# Altium PCB ZYNQ_BOARD.PcbDoc (part 2 of 9)
Units mm, origin at the board's own origin, x right, y up, seen from the top; angles counter-clockwise.
Board outline 120 x 66 mm, 10 copper layers (Top Layer, Internal Plane 1 (GND), Middle Layer 1, Middle Layer 2, Internal Plane 2 (+1.0V), Middle Layer 3, Middle Layer 4, Middle Layer 5 (PWR), Internal Plane 3 (GND), Bottom Layer), stack 0.982 mm thick; 333 components, 331 nets, 1511 pads, 1077 vias.
Unrouted connection lines stored in the file: 30.
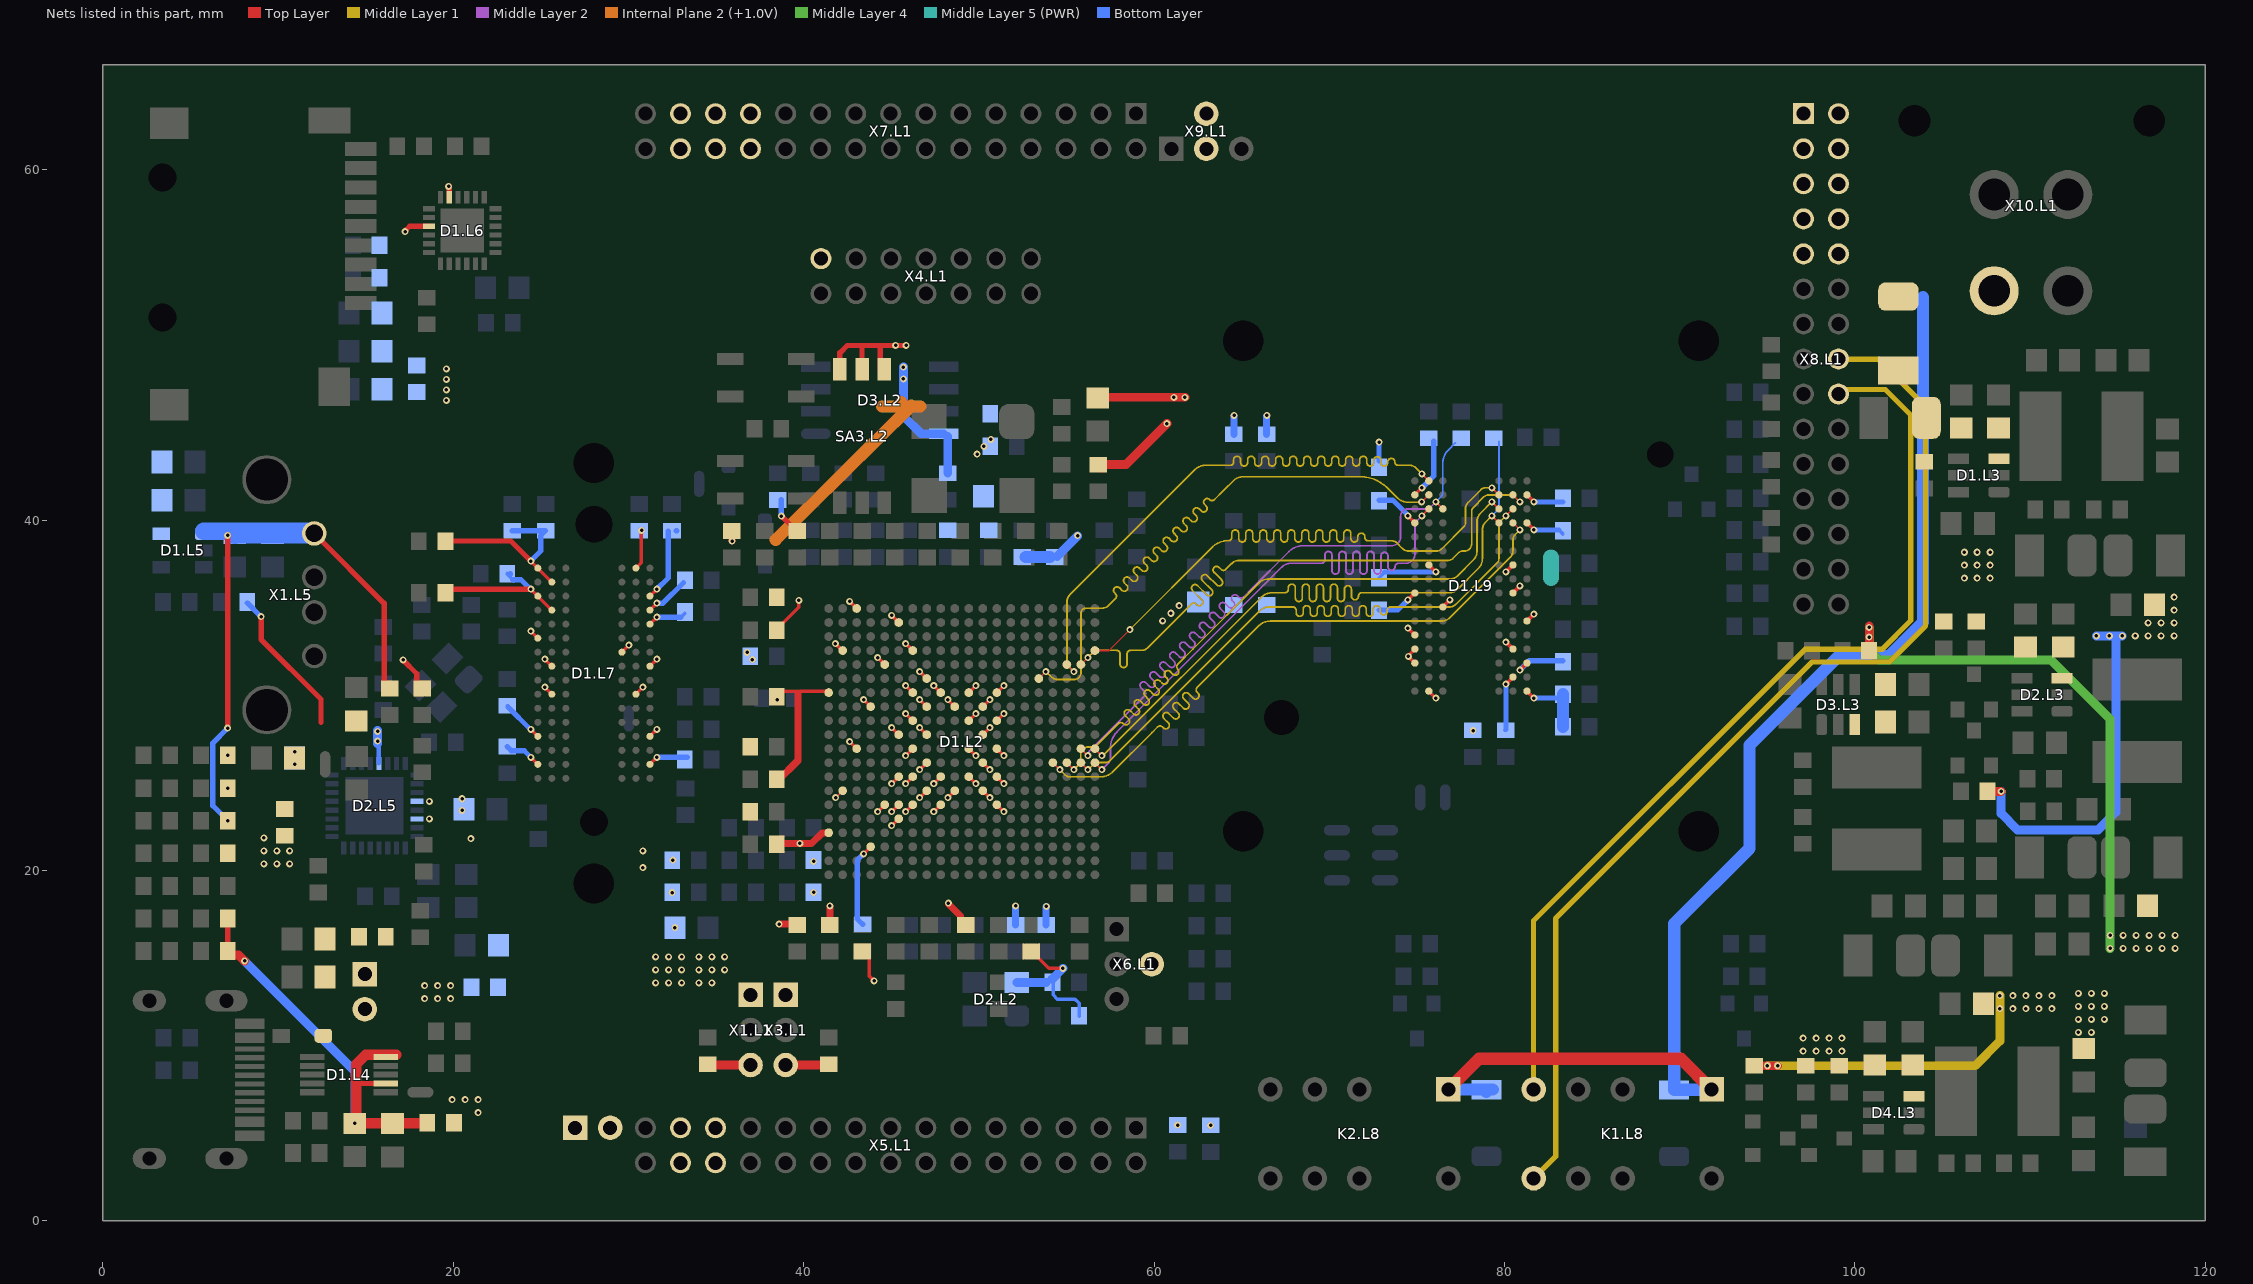
[diagram p10: the nets of this part, all layers, seen from the top]

## Footprints (in the part's own frame and the unit in brackets; to place one, negate y for a bottom-side part, rotate by r counter-clockwise, add the part's x,y. Pads: shape width x height; smd on the part's side, far side on the other; paste and mask are expansions set on the pad) (continued)
CLG-400 [mm]
  round 0.5 smd: A1(-7.6,7.6) A2(-6.8,7.6) A3(-6,7.6) A4(-5.2,7.6) A5(-4.4,7.6) A6(-3.6,7.6) A7(-2.8,7.6) A8(-2,7.6) A9(-1.2,7.6) A10(-0.4,7.6) A11(0.4,7.6) A12(1.2,7.6) A13(2,7.6) A14(2.8,7.6) A15(3.6,7.6) A16(4.4,7.6) A17(5.2,7.6) A18(6,7.6) A19(6.8,7.6) A20(7.6,7.6) B1(-7.6,6.8) B2(-6.8,6.8) B3(-6,6.8) B4(-5.2,6.8) B5(-4.4,6.8) B6(-3.6,6.8) B7(-2.8,6.8) B8(-2,6.8) B9(-1.2,6.8) B10(-0.4,6.8) B11(0.4,6.8) B12(1.2,6.8) B13(2,6.8) B14(2.8,6.8) B15(3.6,6.8) B16(4.4,6.8) B17(5.2,6.8) B18(6,6.8) B19(6.8,6.8) B20(7.6,6.8) C1(-7.6,6) C2(-6.8,6) C3(-6,6) C4(-5.2,6) C5(-4.4,6) C6(-3.6,6) C7(-2.8,6) C8(-2,6) C9(-1.2,6) C10(-0.4,6) C11(0.4,6) C12(1.2,6) C13(2,6) C14(2.8,6) C15(3.6,6) C16(4.4,6) C17(5.2,6) C18(6,6) C19(6.8,6) C20(7.6,6) D1(-7.6,5.2) D2(-6.8,5.2) D3(-6,5.2) D4(-5.2,5.2) D5(-4.4,5.2) D6(-3.6,5.2) D7(-2.8,5.2) D8(-2,5.2) D9(-1.2,5.2) D10(-0.4,5.2) D11(0.4,5.2) D12(1.2,5.2) D13(2,5.2) D14(2.8,5.2) D15(3.6,5.2) D16(4.4,5.2) D17(5.2,5.2) D18(6,5.2) D19(6.8,5.2) D20(7.6,5.2) E1(-7.6,4.4) E2(-6.8,4.4) E3(-6,4.4) E4(-5.2,4.4) E5(-4.4,4.4) E6(-3.6,4.4) E7(-2.8,4.4) E8(-2,4.4) E9(-1.2,4.4) E10(-0.4,4.4) E11(0.4,4.4) E12(1.2,4.4) E13(2,4.4) E14(2.8,4.4) E15(3.6,4.4) E16(4.4,4.4) E17(5.2,4.4) E18(6,4.4) E19(6.8,4.4) E20(7.6,4.4) F1(-7.6,3.6) F2(-6.8,3.6) F3(-6,3.6) F4(-5.2,3.6) F5(-4.4,3.6) F6(-3.6,3.6) F7(-2.8,3.6) F8(-2,3.6) F9(-1.2,3.6) F10(-0.4,3.6) F11(0.4,3.6) F12(1.2,3.6) F13(2,3.6) F14(2.8,3.6) F15(3.6,3.6) F16(4.4,3.6) F17(5.2,3.6) F18(6,3.6) F19(6.8,3.6) F20(7.6,3.6) G1(-7.6,2.8) G2(-6.8,2.8) G3(-6,2.8) G4(-5.2,2.8) G5(-4.4,2.8) G6(-3.6,2.8) G7(-2.8,2.8) G8(-2,2.8) G9(-1.2,2.8) G10(-0.4,2.8) G11(0.4,2.8) G12(1.2,2.8) G13(2,2.8) G14(2.8,2.8) G15(3.6,2.8) G16(4.4,2.8) G17(5.2,2.8) G18(6,2.8) G19(6.8,2.8) G20(7.6,2.8) H1(-7.6,2) H2(-6.8,2) H3(-6,2) H4(-5.2,2) H5(-4.4,2) H6(-3.6,2) H7(-2.8,2) H8(-2,2) H9(-1.2,2) H10(-0.4,2) H11(0.4,2) H12(1.2,2) H13(2,2) H14(2.8,2) H15(3.6,2) H16(4.4,2) H17(5.2,2) H18(6,2) H19(6.8,2) H20(7.6,2) J1(-7.6,1.2) J2(-6.8,1.2) J3(-6,1.2) J4(-5.2,1.2) J5(-4.4,1.2) J6(-3.6,1.2) J7(-2.8,1.2) J8(-2,1.2) J9(-1.2,1.2) J10(-0.4,1.2) J11(0.4,1.2) J12(1.2,1.2) J13(2,1.2) J14(2.8,1.2) J15(3.6,1.2) J16(4.4,1.2) J17(5.2,1.2) J18(6,1.2) J19(6.8,1.2) J20(7.6,1.2) K1(-7.6,0.4) K2(-6.8,0.4) K3(-6,0.4) K4(-5.2,0.4) K5(-4.4,0.4) K6(-3.6,0.4) K7(-2.8,0.4) K8(-2,0.4) K9(-1.2,0.4) K10(-0.4,0.4) K11(0.4,0.4) K12(1.2,0.4) K13(2,0.4) K14(2.8,0.4) K15(3.6,0.4) K16(4.4,0.4) K17(5.2,0.4) K18(6,0.4) K19(6.8,0.4) K20(7.6,0.4) L1(-7.6,-0.4) L2(-6.8,-0.4) L3(-6,-0.4) L4(-5.2,-0.4) L5(-4.4,-0.4) L6(-3.6,-0.4) L7(-2.8,-0.4) L8(-2,-0.4) L9(-1.2,-0.4) L10(-0.4,-0.4) L11(0.4,-0.4) L12(1.2,-0.4) L13(2,-0.4) L14(2.8,-0.4) L15(3.6,-0.4) L16(4.4,-0.4) L17(5.2,-0.4) L18(6,-0.4) L19(6.8,-0.4) L20(7.6,-0.4) M1(-7.6,-1.2) M2(-6.8,-1.2) M3(-6,-1.2) M4(-5.2,-1.2) M5(-4.4,-1.2) M6(-3.6,-1.2) M7(-2.8,-1.2) M8(-2,-1.2) M9(-1.2,-1.2) M10(-0.4,-1.2) M11(0.4,-1.2) M12(1.2,-1.2) M13(2,-1.2) M14(2.8,-1.2) M15(3.6,-1.2) M16(4.4,-1.2) M17(5.2,-1.2) M18(6,-1.2) M19(6.8,-1.2) M20(7.6,-1.2) N1(-7.6,-2) N2(-6.8,-2) N3(-6,-2) N4(-5.2,-2) N5(-4.4,-2) N6(-3.6,-2) N7(-2.8,-2) N8(-2,-2) N9(-1.2,-2) N10(-0.4,-2) N11(0.4,-2) N12(1.2,-2) N13(2,-2) N14(2.8,-2) N15(3.6,-2) N16(4.4,-2) N17(5.2,-2) N18(6,-2) N19(6.8,-2) N20(7.6,-2) P1(-7.6,-2.8) P2(-6.8,-2.8) P3(-6,-2.8) P4(-5.2,-2.8) P5(-4.4,-2.8) P6(-3.6,-2.8) P7(-2.8,-2.8) P8(-2,-2.8) P9(-1.2,-2.8) P10(-0.4,-2.8) P11(0.4,-2.8) P12(1.2,-2.8) P13(2,-2.8) P14(2.8,-2.8) P15(3.6,-2.8) P16(4.4,-2.8) P17(5.2,-2.8) P18(6,-2.8) P19(6.8,-2.8) P20(7.6,-2.8) R1(-7.6,-3.6) R2(-6.8,-3.6) R3(-6,-3.6) R4(-5.2,-3.6) R5(-4.4,-3.6) R6(-3.6,-3.6) R7(-2.8,-3.6) R8(-2,-3.6) R9(-1.2,-3.6) R10(-0.4,-3.6) R11(0.4,-3.6) R12(1.2,-3.6) R13(2,-3.6) R14(2.8,-3.6) R15(3.6,-3.6) R16(4.4,-3.6) R17(5.2,-3.6) R18(6,-3.6) R19(6.8,-3.6) R20(7.6,-3.6) T1(-7.6,-4.4) T2(-6.8,-4.4) T3(-6,-4.4) T4(-5.2,-4.4) T5(-4.4,-4.4) T6(-3.6,-4.4) T7(-2.8,-4.4) T8(-2,-4.4) T9(-1.2,-4.4) T10(-0.4,-4.4) T11(0.4,-4.4) T12(1.2,-4.4) T13(2,-4.4) T14(2.8,-4.4) T15(3.6,-4.4) T16(4.4,-4.4) T17(5.2,-4.4) T18(6,-4.4) T19(6.8,-4.4) T20(7.6,-4.4) U1(-7.6,-5.2) U2(-6.8,-5.2) U3(-6,-5.2) U4(-5.2,-5.2) U5(-4.4,-5.2) U6(-3.6,-5.2) U7(-2.8,-5.2) U8(-2,-5.2) U9(-1.2,-5.2) U10(-0.4,-5.2) U11(0.4,-5.2) U12(1.2,-5.2) U13(2,-5.2) U14(2.8,-5.2) U15(3.6,-5.2) U16(4.4,-5.2) U17(5.2,-5.2) U18(6,-5.2) U19(6.8,-5.2) U20(7.6,-5.2) V1(-7.6,-6) V2(-6.8,-6) V3(-6,-6) V4(-5.2,-6) V5(-4.4,-6) V6(-3.6,-6) V7(-2.8,-6) V8(-2,-6) V9(-1.2,-6) V10(-0.4,-6) V11(0.4,-6) V12(1.2,-6) V13(2,-6) V14(2.8,-6) V15(3.6,-6) V16(4.4,-6) V17(5.2,-6) V18(6,-6) V19(6.8,-6) V20(7.6,-6) W1(-7.6,-6.8) W2(-6.8,-6.8) W3(-6,-6.8) W4(-5.2,-6.8) W5(-4.4,-6.8) W6(-3.6,-6.8) W7(-2.8,-6.8) W8(-2,-6.8) W9(-1.2,-6.8) W10(-0.4,-6.8) W11(0.4,-6.8) W12(1.2,-6.8) W13(2,-6.8) W14(2.8,-6.8) W15(3.6,-6.8) W16(4.4,-6.8) W17(5.2,-6.8) W18(6,-6.8) W19(6.8,-6.8) W20(7.6,-6.8) Y1(-7.6,-7.6) Y2(-6.8,-7.6) Y3(-6,-7.6) Y4(-5.2,-7.6) Y5(-4.4,-7.6) Y6(-3.6,-7.6) Y7(-2.8,-7.6) Y8(-2,-7.6) Y9(-1.2,-7.6) Y10(-0.4,-7.6) Y11(0.4,-7.6) Y12(1.2,-7.6) Y13(2,-7.6) Y14(2.8,-7.6) Y15(3.6,-7.6) Y16(4.4,-7.6) Y17(5.2,-7.6) Y18(6,-7.6) Y19(6.8,-7.6) Y20(7.6,-7.6)
  silkscreen extent -8.5,-8.5 8.5,8.5
"DS1073-01-2x2-MR1T6 (4 pin)" [mm]
  round 1.5 hole 1.8: 0(-6.7,4.85) 0(6.7,4.85)
  round 2.8 hole 1.8: 1(-2.15,-4.85) 2(-2.15,0.65) 3(2.05,-4.85) 4(2.05,0.65)
  silkscreen extent -9.9,1.95 9.8,7.45
"DSX321G (3.2x2.5x0.7)" [mm] "DSX321G"
  rrect50% 1.4x1.2 smd: 1(-1.1,-0.85)
  rect 1.4x1.2 smd: 2(1.1,-0.85) 3(1.1,0.85) 4(-1.1,0.85)
  silkscreen extent -2.25,-1.24 1.6,1.24
KLS7-TS3401 [mm]
  rect 0.7x1.5 smd: 1(1.075,2.025) 2(-1.075,2.025) 3(-1.075,-2.025) 4(1.075,-2.025)
  silkscreen extent -1.79,-2.1 1.78,2.1
"MICRO-SD (9 pin)" [mm]
  round 0.7 hole 1.6: 0(-4.86,-5.67) 0(3.14,-5.67)
  rect 0.8x1.8 smd: 1(2.32,5.67) 2(1.22,5.67) 3(0.12,5.67) 4(-0.98,5.67) 5(-2.08,5.67) 6(-3.18,5.67) 7(-4.28,5.67) 8(-5.38,5.67) 9(-6.48,5.67)
  rect 1.8x2.2 smd: 10(-7.96,-5.26) 13(8.11,-5.26)
  rect 1.5x2.4 smd: 11(-8.11,3.87)
  rect 2.2x1.8 smd: 12(7.1,4.15)
  silkscreen extent -7.29,-9.66 7.43,4.84
"MICRO-USB (USB3,1TYPE-C 16PF-26)" [mm]
  rect 1.7x0.6 smd: 1(2.865,-3.2) 2(2.865,-2.4) 11(2.865,2.4) 12(2.865,3.2)
  rect 1.7x0.3 smd: 3(2.865,-1.75) 4(2.865,-1.25) 5(2.865,-0.75) 6(2.865,-0.25) 7(2.865,0.25) 8(2.865,0.75) 9(2.865,1.25) 10(2.865,1.75)
  oval 1.9x1.2 hole 0.8 slot 1.5 at 0 deg: 13(-2.865,-4.5) 13(-2.865,4.5)
  oval 2.4x1.2 hole 0.8 slot 2 at 0 deg: 13(1.535,-4.5) 13(1.535,4.5)
  silkscreen extent -5.47,-4.5 1.53,4.5
MSOP-10 [mm]
  rect 1.4x0.35 smd: 1(-2.1,1) 2(-2.1,0.5) 3(-2.1,0) 4(-2.1,-0.5) 5(-2.1,-1) 6(2.1,-1) 7(2.1,-0.5) 8(2.1,0) 9(2.1,0.5) 10(2.1,1)
  silkscreen extent -1.1,-1.55 1.1,1.55
"PBD2-30 (DS1026-06-2x15)"#1 [mm]
  rect 1.2x1.2 hole 0.8: 1(-14,-1)
  round 1.2 hole 0.8: 2(-14,1) 3(-12,-1) 4(-12,1) 5(-10,-1) 6(-10,1) 7(-8,-1) 8(-8,1) 9(-6,-1) 10(-6,1) 11(-4,-1) 12(-4,1) 13(-2,-1) 14(-2,1) 15(0,-1) 16(0,1) 17(2,-1) 18(2,1) 19(4,-1) 20(4,1) 21(6,-1) 22(6,1) 23(8,-1) 24(8,1) 25(10,-1) 26(10,1) 27(12,-1) 28(12,1) 29(14,-1) 30(14,1)
  silkscreen extent -15,-2 15,2
"PBD2-30 (DS1026-06-2x15)"#2 [mm]
  rect 1.2x1.2 hole 0.8: 1(-14,-1)
  round 1.2 hole 0.8: 2(-14,1) 3(-12,-1) 4(-12,1) 5(-10,-1) 6(-10,1) 7(-8,-1) 8(-8,1) 9(-6,-1) 10(-6,1) 11(-4,-1) 12(-4,1) 13(-2,-1) 15(0,-1) 17(2,-1) 18(2,1) 19(4,-1) 20(4,1) 21(6,-1) 22(6,1) 23(8,-1) 24(8,1) 25(10,-1) 26(10,1) 27(12,-1) 28(12,1) 29(14,-1) 30(14,1)
  oval 1.1x1.2 hole 0.8: 14(-2,1) 16(0,1)
  silkscreen extent -15,-2 15,2
PLD2-2 [mm]
  rect 1.4x1.4 hole 0.8: 1(0,-1)
  round 1.4 hole 0.8: 2(0,1)
  silkscreen extent -1,-2 1,2
PLD6-2 [mm]
  rect 1.4x1.4 hole 0.8: 1(-2,-1)
  round 0 all layers, no hole: 2(-2,1) 6(2,1)
  round 1.4 hole 0.8: 3(0,-1) 4(0,1) 5(2,-1)
  silkscreen extent -3,-2 3,2
Plosh15X06 [mm]
  oval 0.6x1.5 smd: 1(0,0)
  silkscreen extent -0.61,-1.07 0.61,1.07
PLS3-2 [mm]
  rect 1.4x1.4 hole 0.8: 1(0,-1)
  round 1.4 hole 0.8: 2(0,1) 3(0,3)
  silkscreen extent -1,-2 1,4
QFN-24 [mm]
  rect 0.7x0.3 smd: 1(-1.9,1.25) 2(-1.9,0.75) 3(-1.9,0.25) 4(-1.9,-0.25) 5(-1.9,-0.75) 6(-1.9,-1.25) 13(1.9,-1.25) 14(1.9,-0.75) 15(1.9,-0.25) 16(1.9,0.25) 17(1.9,0.75) 18(1.9,1.25)
  rect 0.3x0.7 smd: 7(-1.25,-1.9) 8(-0.75,-1.9) 9(-0.25,-1.9) 10(0.25,-1.9) 11(0.75,-1.9) 12(1.25,-1.9) 19(1.25,1.9) 20(0.75,1.9) 21(0.25,1.9) 22(-0.25,1.9) 23(-0.75,1.9) 24(-1.25,1.9)
  rect 2.5x2.5 smd: Pad(0,0)
  silkscreen extent -2.6,-2.6 2.6,2.6
QFN-32 [mm]
  rect 0.75x0.3 smd: 1(-2.42,1.75) 2(-2.42,1.25) 3(-2.42,0.75) 4(-2.42,0.25) 5(-2.42,-0.25) 6(-2.42,-0.75) 7(-2.42,-1.25) 8(-2.42,-1.75) 17(2.42,-1.75) 18(2.42,-1.25) 19(2.42,-0.75) 20(2.42,-0.25) 21(2.42,0.25) 22(2.42,0.75) 23(2.42,1.25) 24(2.42,1.75)
  rect 0.3x0.75 smd: 9(-1.75,-2.42) 10(-1.25,-2.42) 11(-0.75,-2.42) 12(-0.25,-2.42) 13(0.25,-2.42) 14(0.75,-2.42) 15(1.25,-2.42) 16(1.75,-2.42) 25(1.75,2.42) 26(1.25,2.42) 27(0.75,2.42) 28(0.25,2.42) 29(-0.25,2.42) 30(-0.75,2.42) 31(-1.25,2.42) 32(-1.75,2.42)
  rect 3.3x3.3 smd: Pad(0,0)
  silkscreen extent -2.55,-2.55 2.55,2.55
SMB(DO-214AA) [mm]
  rrect50% 1.62x2.3 smd: 1(-2.11,0)
  rect 1.62x2.3 smd: 2(2.11,0)
  silkscreen extent -2.35,-1.95 2.35,1.95
SMD03225 [mm]
  rrect50% 1.4x1.2 smd: 1(-1.2,-0.95)
  rect 1.4x1.2 smd: 2(1.2,-0.95) 3(1.2,0.95) 4(-1.2,0.95)
  silkscreen extent -1.6,-1.25 1.6,1.25, body extent -1.6,-1.25 1.6,1.25, height 1.04
SOD80C [mm]
  rrect50% 1.1x1.7 smd: 1(-1.9,0)
  rect 1.1x1.7 smd: 2(1.9,0)
  silkscreen extent -1.85,-1.17 1.85,1.17
SOD323 [mm]
  rect 1x0.8 smd: 1(1.2,0)
  rrect50% 1x0.8 smd: 2(-1.2,0)
  silkscreen extent -0.9,-0.84 0.9,0.84
SOT23-6 [mm]
  rrect50% 0.6x1.2 smd: 1(-0.95,-1.1)
  rect 0.6x1.2 smd: 2(0,-1.1) 3(0.95,-1.1) 4(0.95,1.2) 5(0,1.2) 6(-0.95,1.2)
  silkscreen extent -1.57,-2.03 1.58,2.13
SOT-23 [mm]
  rect 0.8x0.9 smd: 1(-0.95,-1) 2(0.95,-1) 3(0,1)
  silkscreen extent -1.55,-0.72 1.55,0.7
SOT-23-5 [mm]
  rrect50% 0.7x1 smd: 1(0.95,1.2)
  rect 0.7x1 smd: 2(0,1.2) 3(-0.95,1.2) 4(-0.95,-1.2) 5(0.95,-1.2)
  silkscreen extent -1.62,-0.88 1.62,0.88
"SWITCH (DIP-03, DT-03, step 1.27)" [mm]
  rect 0.76x1.3 smd: 1(-1.27,-3.81) 2(0,-3.81) 3(1.27,-3.81) 4(1.27,3.81) 5(0,3.81) 6(-1.27,3.81)
  silkscreen extent -2.25,-3 2.25,3
TAJB [mm]
  rrect50% 1.65x2.4 smd: 1(-1.5,0)
  rect 1.65x2.4 smd: 2(1.5,0)
  silkscreen extent -1.7,-1.53 1.7,1.53
"USBA-1J (DS1095 B-R)" [mm]
  round 1.4 hole 1: 1(-3.5,1.355) 2(-1,1.355) 3(1,1.355) 4(3.5,1.355)
  round 2.8 hole 2.4: 5(-6.57,-1.355) 6(6.57,-1.355)
  silkscreen extent -7.25,-11.63 7.25,2.37
V23079A1001B301 [mm]
  rect 1.4x1.4 hole 0.8: 1(-6.3,-2.54)
  round 1.4 hole 0.8: 3(-1.22,-2.54) 4(1.32,-2.54) 5(3.86,-2.54) 8(3.86,2.54) 9(1.32,2.54) 10(-1.22,2.54) 12(-6.3,2.54)
  silkscreen extent -7.4,-3.63 7.25,3.63
"VFBGA-96 (ZIF)" [mm]
  round 2.2 hole 2.3: 0(0,-12) 0(0,12)
  round 0.2 hole 1.6: 0(0,-8.5)
  round 2 hole 2.1: 0(0,8.5)
  round 0.4 smd: A1(-3.2,6) A2(-2.4,6) A3(-1.6,6) A7(1.6,6) A8(2.4,6) A9(3.2,6) B1(-3.2,5.2) B2(-2.4,5.2) B3(-1.6,5.2) B7(1.6,5.2) B8(2.4,5.2) B9(3.2,5.2) C1(-3.2,4.4) C2(-2.4,4.4) C3(-1.6,4.4) C7(1.6,4.4) C8(2.4,4.4) C9(3.2,4.4) D1(-3.2,3.6) D2(-2.4,3.6) D3(-1.6,3.6) D7(1.6,3.6) D8(2.4,3.6) D9(3.2,3.6) E1(-3.2,2.8) E2(-2.4,2.8) E3(-1.6,2.8) E7(1.6,2.8) E8(2.4,2.8) E9(3.2,2.8) F1(-3.2,2) F2(-2.4,2) F3(-1.6,2) F7(1.6,2) F8(2.4,2) F9(3.2,2) G1(-3.2,1.2) G2(-2.4,1.2) G3(-1.6,1.2) G7(1.6,1.2) G8(2.4,1.2) G9(3.2,1.2) H1(-3.2,0.4) H2(-2.4,0.4) H3(-1.6,0.4) H7(1.6,0.4) H8(2.4,0.4) H9(3.2,0.4) J1(-3.2,-0.4) J2(-2.4,-0.4) J3(-1.6,-0.4) J7(1.6,-0.4) J8(2.4,-0.4) J9(3.2,-0.4) K1(-3.2,-1.2) K2(-2.4,-1.2) K3(-1.6,-1.2) K7(1.6,-1.2) K8(2.4,-1.2) K9(3.2,-1.2) L1(-3.2,-2) L2(-2.4,-2) L3(-1.6,-2) L7(1.6,-2) L8(2.4,-2) L9(3.2,-2) M1(-3.2,-2.8) M2(-2.4,-2.8) M3(-1.6,-2.8) M7(1.6,-2.8) M8(2.4,-2.8) M9(3.2,-2.8) N1(-3.2,-3.6) N2(-2.4,-3.6) N3(-1.6,-3.6) N7(1.6,-3.6) N8(2.4,-3.6) N9(3.2,-3.6) P1(-3.2,-4.4) P2(-2.4,-4.4) P3(-1.6,-4.4) P7(1.6,-4.4) P8(2.4,-4.4) P9(3.2,-4.4) R1(-3.2,-5.2) R2(-2.4,-5.2) R3(-1.6,-5.2) R7(1.6,-5.2) R8(2.4,-5.2) R9(3.2,-5.2) T1(-3.2,-6) T2(-2.4,-6) T3(-1.6,-6) T7(1.6,-6) T8(2.4,-6) T9(3.2,-6)
  silkscreen extent -6.5,-19.65 6.5,18.35
VLS6045EX-4R7M-H [mm]
  rect 2.4x5.1 smd: 1(-2.35,0) 2(2.35,0)
  silkscreen extent -3.15,-3 3.15,3
VSOP-8 [mm]
  oval 1.7x0.6 smd: 1(-3.65,1.905)
  rect 1.7x0.6 smd: 2(-3.65,0.635) 3(-3.65,-0.635) 4(-3.65,-1.905) 5(3.65,-1.905) 6(3.65,-0.635) 7(3.65,0.635) 8(3.65,1.905)
  silkscreen extent -2.41,-2.7 2.39,2.68
"XO91050UITA (7x5mm)" [mm] "HC-49SM"
  rrect50% 2x2 smd: 1(-2.497,-2.105)
  rect 2x2 smd: 2(2.503,-2.105) 3(2.497,2.105) 4(-2.503,2.105)
  silkscreen extent -3.5,-2.5 3.5,2.5

## Part data
C1.L2 C1.L7 C1.L9 C2.L2 C2.L7 C2.L9 C3.L2 C3.L7 C3.L9 C4.L2 C4.L7 C4.L9 C5.L2 C5.L7 C5.L9 C6.L2 C6.L7 C6.L9 C7.L2 C7.L7 C7.L9 C8.L2 C8.L7 C8.L9 C9.L2 C9.L7 C9.L9 C10.L2 C10.L7 C10.L9 C11.L2 C11.L7 C11.L9 C12.L2 C12.L7 C12.L9 C13.L2 C13.L5 C14.L2 C14.L5 C14.L7 C14.L9 C15.L2 C15.L7 C15.L9 C16.L2 C16.L7 C16.L9 C17.L2 C17.L7 C17.L9 C18.L2 C19.L2 C20.L2 C21.L2 C22.L2 C23.L2 C24.L2 C25.L2 C26.L2 C27.L2 C28.L2 C29.L2 C30.L2 C31.L2 C32.L2 C33.L2 C34.L2 C35.L2 C36.L2 C37.L2 C38.L2 C39.L2 C40.L2 C41.L2 C42.L2 C43.L2 C44.L2 C45.L2 C46.L2 C47.L2 C48.L2 C49.L2 C50.L2: library part "Cap (0603) AVX", ComponentHeigt=1.3, Firme=AVX, KIND=Конденсатор, Leadform=SMD, Packaging=0805
C1.L3 C1.L4 C1.L5 C1.L6 C2.L3 C2.L4 C2.L5 C2.L6 C3.L3 C3.L4 C3.L5 C3.L6 C4.L3 C4.L4 C4.L5 C4.L6 C5.L3 C5.L5 C6.L3 C6.L5 C7.L5 C8.L3 C8.L5 C9.L3 C9.L5 C10.L3 C10.L5 C11.L3 C11.L5 C12.L3 C12.L5 C13.L3 C13.L7 C13.L9 C14.L3 C15.L3 C16.L3 C17.L3 C18.L3 C19.L3 C20.L3 C21.L3 C22.L3 C23.L3 C24.L3 C25.L3 C28.L3: library part "Cap (0805) AVX", ComponentHeigt=1.3, Firme=AVX, KIND=Конденсатор, Leadform=SMD, Packaging=0805
C7.L3 C26.L3 C27.L3 C29.L3 C30.L3 C31.L3 C32.L3 C33.L3 C34.L3: library part "TAJ B-AVX", ComponentHeigt=1.6, ComponentWeigt=??, Firme=AVX, KIND=Конденсатор, Packaging=R
D1.L9: library part "FBGA-96 (DDR3)", ComponentHeigt=1.8, Firme=Linear, KIND=Микросхема, Leadform=формована, Packaging=SOT-223
D3.L2: library part "W25Q64VSS (VSOP-8)", ComponentHeigt=1.8, Firme=Linear, KIND=Микросхема, Leadform=формована, Packaging=SOT-223
D4.L2: library part "XO91050UITA (50MHz,7x5mm)", ComponentHeigt=1.8, Firme=Linear, KIND=Микросхема, Leadform=формована, Packaging=SOT-223
KP1.L2 KP1.L5 KP1.L7 KP2.L2 KP3.L2 KP4.L2 KP5.L2 KP6.L2 KP7.L2 KP8.L2 KP9.L2 TNOW: library part Contplosh1.5x0.6
L1.L3 L2.L3 L3.L3 L4.L3: library part "VLS6045EX-4R7M-H (6x6x4.5)", ComponentHeigt=3.2, Firm=TDK, KIND="Катушка индуктивности B82432T TDK", Name="Катушка индуктивности", Packaging="SIMIT 1812-T", Typ=B82432T
R1.L1 R1.L2 R1.L3 R1.L4 R1.L5 R1.L6 R1.L7 R1.L8 R1.L9 R2.L1 R2.L2 R2.L3 R2.L4 R2.L5 R2.L6 R2.L7 R2.L8 R2.L9 R3.L2 R3.L3 R3.L4 R3.L5 R3.L6 R3.L7 R3.L8 R3.L9 R4.L2 R4.L3 R4.L4 R4.L5 R4.L6 R4.L7 R4.L8 R4.L9 R5.L2 R5.L3 R5.L4 R5.L5 R5.L6 R5.L7 R5.L8 R5.L9 R6.L2 R6.L3 R6.L4 R6.L5 R6.L6 R6.L7 R6.L8 R7.L2 R7.L3 R7.L4 R7.L5 R7.L6 R7.L8 R8.L2 R8.L3 R8.L4 R8.L5 R8.L8 R9.L2 R9.L3 R9.L4 R9.L5 R10.L2 R10.L3 R10.L4 R10.L5 R11.L2 R11.L3 R11.L4 R11.L5 R12.L2 R12.L3 R12.L5 R13.L2 R13.L3 R13.L5 R14.L2 R14.L3 R14.L5 R15.L2 R15.L3 R15.L5 R16.L2 R16.L3 R17.L2 R17.L3 R18.L2 R19.L2 R20.L2 R21.L2 R22.L2 R22.L3 R23.L2 R24.L2 R25.L2 R26.L2 R27.L2 R28.L2 R29.L2 R30.L2 R31.L2 R32.L2 R33.L2 R34.L2 R35.L2 R36.L2 R37.L2 R38.L2 R39.L2 R40.L2 R44.L2 R45.L2 R46.L2 R47.L2: library part "RC0603 Yageo", ComponentHeigt=0.5, Firme=Yageo, KIND=Резистор, Leadform=SMD, Packaging=0402
R18.L3 R19.L3 R20.L3 R21.L3: library part "RC0805 Yageo", ComponentHeigt=0.6, Firme=Yageo, KIND=Резистор, Leadform=SMD, Packaging=0805
VD1.L3: library part "MBRS360T3G (SMB)", ComponentHeigt=0.75, Firme=Kingbright, KIND="Светодиод L-1154GD Kingbright", Leadform="в отверстия", NN=24003000
VD1.L5 VD2.L3 VD2.L4 VD3.L2 VD3.L4 VD4.L2 VD4.L4 VD5.L2: library part LED(0603), ComponentHeigt=0.75, Firme=Kingbright, KIND="Светодиод L-1154GD Kingbright", Leadform="в отверстия", NN=24003000
X2.L1 X11.L1: library part PLD2-2, ComponentHeigt=5.5, Name=Вилка, Specification="Вилка PLD2-2 *", Typ=PLD2-2
D1.L2 D1.L4 D1.L6 D1.L7 D2.L5: Component Link=www.honeywell.com/radhard, KIND=Микросхема, Leadform="по чертежу", Note="Установка по чертежу"
D1.L3 D1.L5 D2.L3 D3.L3 D4.L3: ComponentHeigt=1.8, Firme=Linear, KIND=Микросхема, Leadform=формована, Packaging=SOT-223
D2.L2: KIND="Генератор кварцевый 1116R66M00000BF Vectron", NN=24502141
K1.L8 K2.L8: ComponentHeigt=5.6, ComponentWeigt=2, KIND="Реле TQ2-SA-12V Panasonic", Leadform=SMD, NN=26100248, Packaging="SA type"
L1.L2 L2.L2: ComponentHeigt=1.1, Firme=Murata, Leadform=SMD, Packaging=1206
SA1.L2 SA2.L2 SA3.L2: Component Heigt=7, Firme=TYCO, KIND="Кнопка 1-1977223-9 Tyco", Leadform=SMD, NN=25100175
VD1.L2 VD1.L4 VD2.L2: ComponentHeigt=0.75, Firme=Kingbright, KIND="Светодиод L-1154GD Kingbright", Leadform="в отверстия", NN=24003000
VD1.L8 VD2.L8: Component Link=http://www.nxp.com, ComponentHeigt=1.6, Firme=NXP, KIND="Диод LL4148 NXP", Leadform=SMD, NN=24009301, Packaging=SOD-80C
VT1.L2 VT1.L8 VT2.L8: ComponentHeigt=1.1, Firme=ONS, KIND="Транзистор MMBT5551L*G ONS", Leadform=SMD, NN=24007468, Packaging=SOT-23
VT1.L3 VT2.L3 VT3.L3 VT4.L3: ComponentHeigt=1.1, Firme=ONS, KIND="Транзистор MMBT3904L*G ONS", Leadform=SMD, NN=24006226, Packaging=SOT-23
X1.L1 X1.L4 X1.L5 X1.L6 X3.L1 X4.L1 X5.L1 X6.L1 X7.L1 X8.L1 X9.L1 X10.L1: ComponentHeigt=5.5, Name=Вилка, Specification="Вилка PLD2-2 *", Typ=PLD2-2

## Via types
v1: diameter 0.4, hole 0.2, Top Layer to Bottom Layer, 1059 vias
v2: diameter 0.9, hole 0.6, Top Layer to Bottom Layer, 18 vias

## Nets (pads, with @x,y where several pads share a name; then routed paths per layer and width w, separated by ;. In a path a pad name is that pad's centre, name@x,y a point inside that pad or via, vN(x,y) a via of type N, cw(c..) or ccw(c..) an arc to the next point about the centre after c; other vN are vias at no path point)
+1.0V_DCDC: C33.L2.1 C35.L2.1 C37.L2.1 C39.L2.1 C41.L2.1 C42.L2.1 C44.L2.1 C45.L2.1 C47.L2.1 C49.L2.1 D1.L2.G7 D1.L2.G11 D1.L2.G13 D1.L2.H10 D1.L2.H12 D1.L2.J7 D1.L2.J13 D1.L2.K12 D1.L2.L7 D1.L2.L13 D1.L2.M12 D1.L2.N7 D1.L2.N13 D1.L2.P8 D1.L2.P12 D1.L2.R7 D1.L2.R13 R1.L3.2 R18.L3.1 X8.L1.9 X8.L1.10 | length 45.1
  Top Layer w0.2: v1(45.82,23.36) D1.L2.R7@46.22,23.76 ; v1(45.82,24.96) D1.L2.N7@46.22,25.36 ; v1(45.82,26.56) D1.L2.L7@46.22,26.96 ; v1(45.82,28.96) D1.L2.J7@46.22,28.56 ; v1(45.82,30.56) D1.L2.G7@46.22,30.16 ; v1(46.62,24.16) D1.L2.P8@47.02,24.56 ; v1(48.22,29.76) D1.L2.H10@48.62,29.36 ; D1.L2.G11@49.42,30.16 v1(49.82,30.56) ; D1.L2.P12@50.22,24.56 v1(50.62,24.16) ; D1.L2.M12@50.22,26.16 v1(50.62,25.76) ; D1.L2.K12@50.22,27.76 v1(50.62,28.16) ; D1.L2.H12@50.22,29.36 v1(50.62,29.76) ; D1.L2.R13@51.02,23.76 v1(51.42,23.36) ; D1.L2.N13@51.02,25.36 v1(51.42,24.96) ; D1.L2.L13@51.02,26.96 v1(51.42,26.56) ; D1.L2.J13@51.02,28.56 v1(51.42,28.96) ; D1.L2.G13@51.02,30.16 v1(51.42,30.56)
  Top Layer w0.3: C44.L2.1@48.89,17.2 48.949,17.142 49.19,16.9 C44.L2.1@49.24,16.9
  Top Layer w0.4: v1@48.268,18.092 48.949,17.411 48.949,17.142 C44.L2.1@48.949,16.706
  Top Layer w0.508: C45.L2.1@57.016,42.974 C45.L2.1@56.82,43.17 58.386,43.17 v1(60.725,45.509) ; R1.L3.2@107.57,24.535 107.582,24.523 v1(108.34,24.523)
  Bottom Layer w0.3: C47.L2.1@53.84,16.881 C47.L2.1@53.84,16.9
  Bottom Layer w0.4: C49.L2.1@52.09,16.9 v1@52.09,17.958 ; C47.L2.1@53.84,16.9 v1@53.84,17.939 ; C33.L2.1@64.555,44.9 v1@64.555,45.958 ; C35.L2.1@66.426,44.9 v1@66.426,45.958
  Bottom Layer w0.508: C37.L2.1@54.472,37.935 v1@55.639,39.103 ; v1(108.34,24.523) 108.34,23.261 109.277,22.324 113.881,22.324 114.903,23.346 114.903,33.392 v1(114.52,33.392) 114.164,33.392 114.164,33.394 114.162,33.392 v1(113.78,33.392) ; 114.905,33.392 v1(115.26,33.392)
  Bottom Layer w0.7: C39.L2.1@52.67,37.9 C37.L2.1@54.059,37.9
  other v1: 53.844,17.96 52.094,17.98 48.249,18.138 40.562,18.75 40.562,20.53 116,33.392 116.741,33.392 117.481,33.392 118.221,33.392 116.741,34.133 117.481,34.133 118.221,34.133 118.221,34.873 118.221,35.613 55.629,39.125 64.559,45.98 66.429,45.98
+1.8V_DCDC: C7.L2.1 C8.L2.1 C9.L2.1 C10.L2.1 C13.L2.1 C14.L2.1 D1.L2.F8 D1.L2.G9 D1.L2.H8 D1.L2.J11 D1.L2.K8 D1.L2.L11 D1.L2.M8 D1.L2.N9 D1.L2.N11 D1.L2.P10 D1.L2.R9 L1.L2.1 R3.L5.1 R5.L3.1 R19.L3.1 R34.L2.1 R35.L2.1 X1.L1.3 X3.L1.3 X5.L1.27 X7.L1.28 X8.L1.5 X8.L1.6 | length 42.4
  Top Layer w0.2: v1(46.62,25.76) D1.L2.M8@47.02,26.16 ; v1(46.62,28.16) D1.L2.K8@47.02,27.76 ; v1(46.62,29.76) D1.L2.H8@47.02,29.36 ; v1(46.62,31.36) D1.L2.F8@47.02,30.96 ; v1(47.42,23.36) D1.L2.R9@47.82,23.76 ; v1(47.42,24.96) D1.L2.N9@47.82,25.36 ; v1(47.42,30.56) D1.L2.G9@47.82,30.16 ; v1(48.22,24.16) D1.L2.P10@48.62,24.56 ; D1.L2.N11@49.42,25.36 v1(49.82,24.96) ; D1.L2.L11@49.42,26.96 v1(49.82,26.56) ; D1.L2.J11@49.42,28.56 v1(49.82,28.96)
  Top Layer w0.508: C9.L2.1@34.489,8.9 X1.L1.3@36.965,8.9 ; X3.L1.3@38.965,8.9 41.441,8.9 C10.L2.1@41.491,8.95 ; R5.L3.1@100.817,32.567 v1(100.817,33.325) v1(100.817,33.885) v1@100.817,33.954
  Middle Layer 4 w0.508: v1(100.817,33.885) v1(100.817,33.325) 100.817,32.583 101.37,32.03 111.185,32.03 114.57,28.645 v1(114.57,16.302) v1(114.57,15.562)
  other v1: 61.345,5.472 63.22,5.46 18.357,12.695 19.097,12.695 19.838,12.695 18.357,13.435 19.097,13.435 19.838,13.435 115.31,15.562 116.05,15.562 116.791,15.562 117.531,15.562 118.271,15.562 115.31,16.302 116.05,16.302 116.791,16.302 117.531,16.302 118.271,16.302 49.896,43.766 50.287,44.208 50.681,44.616
+1.8V_USB_OTG: C6.L5.1 C7.L5.1 D2.L5.28 D2.L5.30 R3.L5.2
  other v1: 20.998,21.817 18.63,22.95 20.5,23.442 18.63,23.95 20.5,24.1
+1.35V_DCDC: C19.L2.1 C22.L2.1 C23.L2.1 C24.L2.1 C27.L2.1 C30.L2.1 D1.L2.A3 D1.L2.D2 D1.L2.E5 D1.L2.G1 D1.L2.H4 D1.L2.L3 D1.L2.P2 D1.L2.R5 D1.L2.U1 D1.L2.V4 R1.L2.1 R2.L3.2 R21.L3.1 X6.L1.4 X8.L1.7 X8.L1.8 X9.L1.4 X11.L1.2 | length 41.7
  Top Layer w0.1: v1(41.82,24.16) D1.L2.P2@42.22,24.56
  Top Layer w0.2: C22.L2.1@38.38,30.228 D1.L2.G1@41.422,30.228 ; C22.L2.1@38.46,29.74 38.46,29.79 C22.L2.1@38.81,30.14 ; C23.L2.1@38.46,33.72 38.46,33.77 38.81,34.12 39.723,35.032 39.723,35.415 v1(39.718,35.42) ; C30.L2.1@38.46,35.6 C30.L2.1@38.778,35.918 ; D1.L2.G1@41.392,30.188 D1.L2.G1@41.42,30.16 ; v1(41.806,32.96) 42.206,32.56 D1.L2.D2@42.22,32.56 ; v1(42.62,27.36) D1.L2.L3@43.02,26.96 ; v1(42.62,35.36) D1.L2.A3@43.02,34.96 ; v1(43.42,20.96) D1.L2.V4@43.82,21.36 ; v1(43.42,29.76) D1.L2.H4@43.82,29.36 ; v1(44.22,23.36) D1.L2.R5@44.62,23.76 ; v1(44.22,32.16) D1.L2.E5@44.62,31.76
  Top Layer w0.4: C24.L2.1@38.46,25.16 C24.L2.1@38.46,25.21 C24.L2.1@38.46,25.26 ; C19.L2.1@38.52,21.54 v1@39.78,21.54 ; C24.L2.1@38.534,25.141 39.66,26.267 39.66,30.132 ; v1(39.78,21.557) 39.797,21.54 40.453,21.54 41.053,22.141 41.401,22.141 D1.L2.U1@41.42,22.16
  Top Layer w0.508: R2.L3.2@94.24,8.86 v1(94.998,8.86) v1(95.59,8.86)
  Middle Layer 1 w0.508: v1(94.998,8.86) v1(95.59,8.86) 106.86,8.86 108.28,10.28 v1(108.28,12.12) v1(108.28,12.86)
  Bottom Layer w0.3: C27.L2.1@43.37,16.94 43.356,16.94 43.056,17.24 43.056,20.596 v1(43.42,20.96)
  other v1: 109.02,12.12 109.76,12.12 110.5,12.12 111.241,12.12 109.02,12.86 109.76,12.86 110.5,12.86 111.241,12.86 34.01,13.592 34.75,13.592 34.01,14.332 34.75,14.332 35.49,14.332 34.01,15.073 34.75,15.073 35.49,15.073 38.495,29.76 37.061,32.043 36.764,32.456
+1.35V_RAM_PL: C1.L9.1 C2.L9.1 C3.L9.1 C4.L9.1 C5.L9.1 C6.L9.1 C7.L9.1 C8.L9.1 C9.L9.1 C10.L9.1 C11.L9.1 C12.L9.1 C13.L9.1 C14.L9.1 D1.L9.A1 D1.L9.A8 D1.L9.B2 D1.L9.C1 D1.L9.C9 D1.L9.D2 D1.L9.D9 D1.L9.E9 D1.L9.F1 D1.L9.G7 D1.L9.H2 D1.L9.H9 D1.L9.K2 D1.L9.K8 D1.L9.N1 D1.L9.N9 D1.L9.R1 D1.L9.R9 R4.L9.2 X9.L1.3 | length 35
  Top Layer w0.2: v1@74.48,32.245 D1.L9.C9@74.88,31.845 ; v1(74.48,33.845) D1.L9.E9@74.88,33.445 ; v1(74.48,35.445) D1.L9.H9@74.88,35.845 ; v1(74.48,40.245) D1.L9.N9@74.88,39.845 ; v1(74.505,32.224) 74.559,32.324 D1.L9.D9@74.88,32.645 ; D1.L9.R9@74.88,41.445 v1(75.28,41.845) ; D1.L9.A8@75.68,30.245 v1(76.08,29.845) ; D1.L9.K8@75.68,37.445 v1(76.08,37.045) ; D1.L9.G7@76.48,35.045 v1(76.88,35.445) ; v1(80.08,30.645) D1.L9.B2@80.48,31.045 ; v1(80.08,33.045) D1.L9.D2@80.48,32.645 ; v1(80.08,37.045) D1.L9.K2@80.48,37.445 ; D1.L9.H2@80.48,35.845 v1(80.88,36.245) ; v1(80.88,31.445) D1.L9.C1@81.28,31.845 ; D1.L9.A1@81.28,30.245 v1(81.68,29.845) ; D1.L9.F1@81.28,34.245 v1(81.68,34.645) ; D1.L9.N1@81.28,39.845 v1(81.68,39.445) ; D1.L9.R1@81.28,41.445 v1(81.68,41.045)
  Middle Layer 5 (PWR) w0.9: 82.65,36.7 82.65,37.87
  Bottom Layer w0.2: C2.L9.1@72.84,36.725 C2.L9.1@73.16,37.045 ; C1.L9.1@80.02,28.01 C1.L9.1@80.08,28.07 ; C10.L9.1@83.1,39.445 C10.L9.1@83.335,39.21 ; C6.L9.1@83.12,29.845 C6.L9.1@83.335,30.06 ; C11.L9.1@83.321,41.045 C11.L9.1@83.335,41.059
  Bottom Layer w0.3: C3.L9.1@72.84,34.87 73.905,34.87 v1(74.48,35.445) ; C5.L9.1@72.84,41.14 73.625,41.14 v1@74.48,40.285 ; C4.L9.1@72.84,43.38 v1@72.84,44.438 ; C2.L9.1@73.16,37.045 v1(76.08,37.045) ; v1(75.28,41.845) 75.96,42.525 C12.L9.1@75.96,44.51 ; C1.L9.1@80.08,28.07 v1(80.08,30.645) ; v1(80.88,31.445) 81.405,31.97 C7.L9.1@83.335,31.97 ; v1(81.68,29.845) C6.L9.1@83.12,29.845 ; v1(81.68,39.445) C10.L9.1@83.1,39.445 ; v1(81.68,41.045) C11.L9.1@83.321,41.045
  Bottom Layer w0.7: C8.L9.1@83.335,28.2 C6.L9.1@83.335,30.06
  other v1: 78.205,27.984 60.482,34.247 60.957,34.688 61.432,35.128 72.844,44.46
+1.35V_RAM_PS: C1.L7.1 C2.L7.1 C3.L7.1 C4.L7.1 C5.L7.1 C6.L7.1 C7.L7.1 C8.L7.1 C9.L7.1 C10.L7.1 C11.L7.1 C12.L7.1 C13.L7.1 C14.L7.1 D1.L7.A1 D1.L7.A8 D1.L7.B2 D1.L7.C1 D1.L7.C9 D1.L7.D2 D1.L7.D9 D1.L7.E9 D1.L7.F1 D1.L7.G7 D1.L7.H2 D1.L7.H9 D1.L7.K2 D1.L7.K8 D1.L7.N1 D1.L7.N9 D1.L7.R1 D1.L7.R9 R4.L7.2 X11.L1.1 | length 41.6
  Top Layer w0.2: v1(24.42,26.465) D1.L7.R1@24.82,26.065 ; v1(24.42,28.065) D1.L7.N1@24.82,27.665 ; v1(24.42,33.665) D1.L7.F1@24.82,33.265 ; v1(24.42,36.065) D1.L7.C1@24.82,35.665 D1.L7.D2@25.62,34.865 ; v1(24.42,37.665) D1.L7.A1@24.82,37.265 D1.L7.B2@25.62,36.465 ; v1(25.22,30.465) D1.L7.K2@25.62,30.065 ; v1(25.22,32.065) D1.L7.H2@25.62,31.665 ; D1.L7.G7@29.62,32.465 v1(30.02,32.865) ; D1.L7.K8@30.42,30.065 v1(30.82,30.465) ; D1.L7.A8@30.42,37.265 30.734,37.579 30.734,39.404 v1(30.75,39.42) ; D1.L7.R9@31.22,26.065 v1(31.62,26.465) ; D1.L7.N9@31.22,27.665 v1(31.62,28.065) ; D1.L7.H9@31.22,31.665 v1(31.62,32.065) ; D1.L7.E9@31.22,34.065 v1(31.62,34.465) ; D1.L7.D9@31.22,34.865 v1(31.62,35.265) ; D1.L7.C9@31.22,35.665 v1(31.62,36.065)
  Top Layer w0.3: C9.L7.1@19.55,38.808 23.277,38.808 v1(24.42,37.665) ; C5.L7.1@19.58,36.065 v1(24.42,36.065)
  Bottom Layer w0.2: C11.L7.1@23.069,29.41 C11.L7.1@23.119,29.41 ; C1.L7.1@23.08,36.96 C1.L7.1@23.08,36.95 23.08,36.91 23.39,36.6 C1.L7.1@23.43,36.56 ; v1(24.42,28.065) v1@24.42,28.109 ; C12.L7.1@32.995,34.465 C12.L7.1@33.22,34.69
  Bottom Layer w0.3: C4.L7.1@23.07,27.08 23.31,26.84 24.045,26.84 v1(24.42,26.465) ; C11.L7.1@23.119,29.34 v1@24.42,28.039 ; C1.L7.1@23.24,36.91 C1.L7.1@23.24,36.96 ; C7.L7.1@23.35,39.4 C2.L7.1@25.26,39.4 24.99,39.13 24.99,38.235 v1(24.42,37.665) ; C1.L7.1@23.37,36.6 23.39,36.6 23.865,36.6 v1@24.36,36.105 ; v1(31.62,26.465) v1@31.622,26.465 ; v1(31.62,34.465) C12.L7.1@32.995,34.465 ; v1(31.62,35.265) 31.965,35.265 C6.L7.1@33.13,36.43 ; v1(31.62,36.065) 32.263,36.708 C10.L7.1@32.263,39.38 ; v1@31.622,26.505 31.653,26.474 C8.L7.1@33.361,26.474 ; C10.L7.1@32.71,39.4 C10.L7.1@32.76,39.4
  other v1: 31.548,13.592 32.288,13.592 33.028,13.592 31.548,14.332 32.288,14.332 33.028,14.332 31.548,15.073 32.288,15.073 33.028,15.073 32.64,16.74 32.49,18.74 32.53,20.6
+3.3V_DCDC: C4.L2.1 C17.L2.1 C18.L2.1 C20.L2.1 C21.L2.1 D1.L2.B6 D1.L2.D7 D1.L2.K6 D1.L2.N6 D1.L2.R6 D1.L2.T6 D2.L2.4 D3.L2.8 L2.L2.1 R2.L5.1 R3.L6.1 R5.L4.1 R11.L2.2 R16.L2.2 R20.L3.1 R22.L3.1 R30.L2.1 R31.L2.1 R32.L2.1 R36.L2.1 R37.L2.1 R38.L2.1 R39.L2.1 SA3.L2.4 SA3.L2.5 SA3.L2.6 X1.L1.1 X3.L1.1 X4.L1.2 X5.L1.25 X5.L1.26 X5.L1.28 X7.L1.25 X7.L1.26 X7.L1.27 X8.L1.3 X8.L1.4 | length 51.9
  Top Layer w0.2: R38.L2.1@43.4,15.43 43.75,15.08 43.75,13.96 v1(44.01,13.7) ; v1(45.02,22.56) D1.L2.T6@45.42,22.96 ; v1(45.02,23.36) D1.L2.R6@45.42,23.76 ; v1(45.02,24.96) D1.L2.N6@45.42,25.36 ; v1(45.02,28.16) D1.L2.K6@45.42,27.76 ; v1(45.02,34.56) D1.L2.B6@45.42,34.16 ; v1(45.82,32.96) D1.L2.D7@46.22,32.56 ; R31.L2.1@53.211,15.19 53.978,14.423 v1(54.797,14.423)
  Top Layer w0.3: v1(38.72,40.23) 39.46,39.49 ccw(c39.63,39.66) R16.L2.2@39.63,39.42 ; SA3.L2.6@42.06,48.34 SA3.L2.6@42.06,48.61 42.06,49.55 42.485,49.975 43.32,49.975 ; SA3.L2.5@43.33,48.34 SA3.L2.5@43.33,48.61 43.33,49.951 ccw(c43.296,49.951) 43.32,49.975 ; SA3.L2.4@44.37,48.57 SA3.L2.4@44.37,48.84 ; 44.37,49.94 SA3.L2.4@44.37,48.84 ; SA3.L2.4@44.6,48.61 SA3.L2.4@44.37,48.84 ; v1@45.84,49.975 43.32,49.975
  Top Layer w0.4: C18.L2.1@35.906,39.319 35.906,38.806 v1(35.908,38.808) ; v1@38.63,16.95 C21.L2.1@39.53,16.95 ; C20.L2.1@41.49,17.05 v1@41.49,17.95
  Top Layer w0.508: L2.L2.1@56.78,47.02 61.76,47.02 v1@61.77,47.02
  Internal Plane 2 (+1.0V) w0.7: 38.404,38.883 46.099,46.49 ; 44.47,46.49 45.327,46.49 ; 45.57,46.73 45.327,46.49 ; 46.141,46.532 46.099,46.49 ; 46.66,46.49 46.099,46.49 ; 45.327,46.49 46.099,46.49
  Bottom Layer w0.2: C4.L2.1@54.195,13.62 C4.L2.1@54.233,13.582 ; C4.L2.1@54.233,13.552 54.233,12.907 54.479,12.661 55.48,12.661 55.715,12.426 R11.L2.2@55.715,11.721 R11.L2.2@55.715,11.691
  Bottom Layer w0.3: v1(38.72,40.23) R30.L2.1@38.72,41.16
  Bottom Layer w0.508: v1(45.692,48.738) v1(45.692,48.06) 45.692,45.941 46.698,44.935 D3.L2.8@47.99,44.935 ; C17.L2.1@48.22,42.68 D3.L2.8@48.22,44.785 ; D2.L2.4@52.165,13.61 C4.L2.1@53.84,13.61 ; C4.L2.1@54.179,13.806 v1(54.797,14.423)
  other v1: 21.416,6.19 19.935,6.93 20.675,6.93 21.416,6.93 112.751,10.771 113.492,10.771 112.751,11.511 113.492,11.511 114.232,11.511 112.751,12.251 113.492,12.251 114.232,12.251 112.751,12.991 113.492,12.991 114.232,12.991 38.6,16.95 41.49,17.98 30.82,20.17 9.18,20.38 9.92,20.38 10.66,20.38 9.18,21.12 9.92,21.12 10.66,21.12 30.82,21.12 9.18,21.86 7.12,24.71 7.12,26.57 19.596,46.84 61.121,47.012 61.76,47.012 19.596,47.44 19.596,48.04 19.596,48.63 45.25,49.98 45.84,49.98
+3.3V_SD_PWR: C2.L6.1 C3.L6.1 C4.L6.1 D1.L6.17 D1.L6.21 R3.L6.2 R4.L6.2 R6.L6.1 | length 2.2
  Top Layer w0.3: v1(17.24,56.465) 17.24,56.51 17.51,56.78 D1.L6.21@18.61,56.78 ; D1.L6.17@19.76,58.36 v1@19.76,59.071
  other v1: 19.732,59.055
+3.3V_UART: C3.L4.1 C4.L4.1 D1.L4.7 D1.L4.10 R5.L4.2 R10.L4.1 R11.L4.1 | length 27.1
  Top Layer w0.3: R10.L4.1@7.12,15.41 R11.L4.1@7.12,17.265 ; 14.37,7.85 14.46,7.85 D1.L4.7@16.14,7.85
  Top Layer w0.508: R10.L4.1@6.94,15.17 R10.L4.1@7.316,15.17 ; R10.L4.1@7.12,15.41 7.316,15.214 R10.L4.1@7.316,15.17 ; v1@8.08,14.835 7.745,15.17 R10.L4.1@7.316,15.17
  Top Layer w0.6: v1(14.37,5.57) C4.L4.1@14.46,5.57 ; D1.L4.10@16.752,9.482 14.992,9.482 14.46,8.95 14.46,7.85 C4.L4.1@14.46,5.57 ; R5.L4.2@18.51,5.605 18.475,5.57 C4.L4.1@14.46,5.57
  Bottom Layer w0.508: v1(8.08,14.84) 8.08,14.835 14.37,8.545 v1(14.37,5.57)
+3.3V_USB_OTG: C1.L5.1 C11.L5.1 C12.L5.1 D2.L5.21 R2.L5.2 R4.L5.2 R12.L5.2 | length 12.6
  Top Layer w0.3: v1(9.03,34.49) 9.03,33.19 12.44,29.78 12.44,28.465 ; v1(17.126,32.02) 17.911,31.236 R12.L5.2@17.911,30.4
  Bottom Layer w0.1: R4.L5.2@8.24,35.28 R4.L5.2@8.24,35.33 ; v1(9.03,34.49) v1@9.06,34.49
  Bottom Layer w0.2: v1(15.68,27.39) 15.68,27.309 v1@15.75,27.239
  Bottom Layer w0.25: D2.L5.21@15.75,26.12 v1@15.75,27.239
  Bottom Layer w0.3: R4.L5.2@8.24,35.28 v1(9.03,34.49)
  Bottom Layer w0.508: v1@15.68,27.265 15.68,27.308 v1@15.68,27.99
  other v1: 10.95,26.06 10.95,26.79 15.68,27.95
+5V_FROM_USB: R6.L4.1 X2.L1.1
+5V_MAIN: C1.L3.1 C2.L3.1 C3.L3.1 C4.L3.1 C5.L3.1 C6.L3.1 C7.L3.1 C8.L3.1 C9.L3.1 D1.L3.3 D2.L3.3 D3.L3.3 D4.L3.3 R3.L3.2 R4.L3.2 R6.L3.2 R7.L3.2 R8.L3.1 VD1.L3.2
  other v1: 97.04,9.69 97.78,9.69 98.52,9.69 99.26,9.69 97.04,10.43 97.78,10.43 98.52,10.43 99.26,10.43 106.24,36.69 106.98,36.69 107.721,36.69 106.24,37.43 106.98,37.43 107.721,37.43 106.24,38.17 106.98,38.17 107.721,38.17
+5V_RELE: C2.L5.1 C3.L5.1 D1.L5.5 K1.L8.1 K2.L8.1 VD1.L3.1 VD1.L8.2 VD2.L8.2 X2.L1.2 X7.L1.23 X7.L1.24 X8.L1.1 X8.L1.2 X10.L1.1 | length 74.2
  Top Layer w0.7: K2.L8.1@76.79,7.51 78.54,9.26 90.07,9.26 K1.L8.1@91.82,7.51
  Bottom Layer w0.7: K2.L8.1@76.708,7.51 K2.L8.1@76.79,7.51 78.89,7.51 VD2.L8.2@78.96,7.51 ; VD2.L8.2@78.96,7.36 VD2.L8.2@78.96,7.51 ; VD2.L8.2@79.328,7.51 VD2.L8.2@78.96,7.51 ; K1.L8.1@91.82,7.51 91.805,7.495 89.695,7.495 VD1.L8.2@89.68,7.48 89.68,16.96 93.984,21.264 93.984,27.154 99.077,32.247 101.967,32.247 103.89,34.17 103.89,52.73
+5V_USB_OTG: C8.L5.1 C9.L5.1 D1.L5.1 R9.L5.2 R14.L5.1 X1.L5.1 | length 33.9
  Top Layer w0.3: v1(7.12,28.129) v1@7.12,39.18 ; X1.L5.1@12.06,39.245 16.05,35.255 R9.L5.2@16.05,30.4
  Bottom Layer w0.3: v1(7.12,22.85) 6.27,23.7 6.27,27.279 v1(7.12,28.129)
  Bottom Layer w1: D1.L5.1@5.74,39.38 C9.L5.1@7.5,39.38 ; C9.L5.1@7.5,39.22 C9.L5.1@7.52,39.24
  Bottom Layer w1.2: C9.L5.1@7.495,39.275 X1.L5.1@11.98,39.275 ; C9.L5.1@7.52,39.24 7.57,39.24 C9.L5.1@7.575,39.245
  other v1: 7.11,39.14
+5V_USB_UART: C1.L4.1 C2.L4.1 R6.L4.2 VD1.L4.2
A0: D1.L2.L20 D1.L9.N3 R2.L8.2 | length 42.3
  Top Layer w0.1: D1.L2.L20@56.62,26.96 v1(57.02,26.56) ; v1(79.28,40.245) D1.L9.N3@79.68,39.845
  Middle Layer 1 w0.1: v1@57.02,26.5 66.13,35.61 cw(c66.731,35.009) 66.731,35.859 67.41,35.859 67.46,35.859 ccw(c67.46,36.059) 67.66,36.059 67.66,36.149 cw(c67.86,36.149) 68.06,36.149 68.06,35.557 ccw(c68.26,35.557) 68.46,35.557 68.46,36.149 cw(c68.66,36.149) 68.86,36.149 68.86,35.557 ccw(c69.06,35.557) 69.26,35.557 69.26,36.149 cw(c69.46,36.149) 69.66,36.149 69.66,35.557 ccw(c69.86,35.557) 70.06,35.557 70.06,36.149 cw(c70.26,36.149) 70.46,36.149 70.46,35.557 ccw(c70.66,35.557) 70.86,35.557 70.86,36.059 cw(c71.06,36.059) 71.26,36.059 71.26,35.659 ccw(c71.46,35.659) 71.66,35.659 cw(c71.86,35.659) 71.86,35.859 72.87,35.859 76.88,35.859 ccw(c76.88,36.441) 77.291,36.029 78.506,37.244 ccw(c77.954,37.796) 78.735,37.796 78.735,39.446 ; 78.735,39.447 cw(c79.346,39.447) 78.914,39.879 v1(79.28,40.245)
  Bottom Layer w0.1: v1(79.28,40.245) 79.516,40.481 ccw(c79.123,40.874) 79.679,40.874 R2.L8.2@79.679,44.51
A0_M0_F: K1.L8.8 X8.L1.16 | length 62
  Middle Layer 1 w0.3: K1.L8.8@81.66,2.43 82.918,3.688 82.918,17.264 97.555,31.902 101.975,31.902 104.029,33.955 104.029,46.486 101.325,49.19 X8.L1.16@99.01,49.19
A1: D1.L2.L19 D1.L9.P7 R1.L8.2 | length 41.4
  Top Layer w0.1: D1.L2.L19@55.82,26.96 v1(56.22,26.56) ; v1(76.08,41.045) D1.L9.P7@76.48,40.645
  Middle Layer 2 w0.1: v1(56.22,26.56) cw(c56.642,26.56) 56.343,26.858 59.408,29.923 59.444,29.958 ccw(c59.302,30.1) 59.444,30.241 59.25,30.435 cw(c59.391,30.577) 59.25,30.718 cw(c59.391,30.577) 59.533,30.718 59.731,30.52 ccw(c59.872,30.661) 60.014,30.52 ccw(c59.872,30.661) 60.014,30.803 59.815,31.001 cw(c59.957,31.142) 59.815,31.284 cw(c59.957,31.142) 60.098,31.284 60.296,31.086 ccw(c60.438,31.227) 60.579,31.086 ccw(c60.438,31.227) 60.579,31.368 60.381,31.567 cw(c60.523,31.708) 60.381,31.849 cw(c60.523,31.708) 60.664,31.849 60.862,31.651 ccw(c61.004,31.793) 61.145,31.651 ccw(c61.004,31.793) 61.145,31.934 60.947,32.132 cw(c61.088,32.274) 60.947,32.415 cw(c61.088,32.274) 61.23,32.415 61.428,32.217 ccw(c61.569,32.358) 61.711,32.217 ccw(c61.569,32.358) 61.711,32.5 61.512,32.698 cw(c61.654,32.839) 61.512,32.981 cw(c61.654,32.839) 61.795,32.981 61.994,32.783 ccw(c62.135,32.924) 62.276,32.783 ccw(c62.135,32.924) 62.276,33.065 62.078,33.264 cw(c62.22,33.405) 62.078,33.546 cw(c62.22,33.405) 62.361,33.546 62.559,33.348 ccw(c62.701,33.49) 62.842,33.348 ; 62.842,33.348 ccw(c62.701,33.49) 62.842,33.631 62.644,33.829 cw(c62.785,33.971) 62.644,34.112 cw(c62.785,33.971) 62.927,34.112 63.125,33.914 ccw(c63.266,34.055) 63.408,33.914 ccw(c63.266,34.055) 63.408,34.197 63.21,34.395 cw(c63.351,34.536) 63.21,34.678 cw(c63.351,34.536) 63.492,34.678 63.691,34.48 ccw(c63.832,34.621) 63.973,34.48 ccw(c63.832,34.621) 63.973,34.762 63.775,34.961 cw(c63.917,35.102) 63.775,35.244 cw(c63.917,35.102) 64.058,35.244 64.256,35.045 ccw(c64.398,35.187) 64.539,35.045 ccw(c64.398,35.187) 64.539,35.328 64.469,35.399 cw(c64.61,35.54) 64.469,35.681 cw(c64.61,35.54) 64.752,35.681 64.818,35.615 ccw(c64.959,35.757) 65.101,35.615 65.608,36.122 67.699,38.214 cw(c68.483,37.43) 68.483,38.539 73.534,38.539 ; 73.535,38.539 ccw(c73.535,39.085) 73.922,38.699 ccw(c73.577,39.044) 74.065,39.044 74.065,40.224 cw(c74.493,40.224) 74.19,40.526 cw(c74.459,40.258) 74.459,40.638 75.448,40.638 ccw(c75.448,41.181) 75.832,40.797 v1(76.08,41.045)
  Bottom Layer w0.1: v1(76.08,41.045) 76.355,41.32 ccw(c76.059,41.617) 76.478,41.617 76.478,43.254 cw(c77.533,43.254) 76.787,44 R1.L8.2@77.196,44.41
A1_M0_F: K1.L8.5 X8.L1.18 | length 54.8
  Middle Layer 1 w0.3: K1.L8.5@81.66,7.51 81.66,17.138 97.149,32.627 101.547,32.627 103.19,34.27 103.19,46 101.733,47.457 X8.L1.18@98.941,47.457
A2: D1.L2.M18 D1.L9.P3 | length 37.9
  Top Layer w0.1: D1.L2.M18@55.02,26.16 v1(55.42,25.76) ; v1(79.28,41.045) D1.L9.P3@79.68,40.645
  Middle Layer 1 w0.1: v1(55.42,25.76) 55.704,26.044 ccw(c55.448,26.3) 55.81,26.3 55.81,26.639 cw(c56.231,26.639) 55.933,26.937 cw(c56.224,26.646) 56.224,27.057 56.392,27.057 ccw(c56.392,27.625) 56.79,27.22 57.639,28.069 57.957,28.387 cw(c58.098,28.246) 58.24,28.387 58.253,28.374 ccw(c58.394,28.515) 58.535,28.374 ccw(c58.394,28.515) 58.535,28.657 58.351,28.841 cw(c58.492,28.983) 58.351,29.124 cw(c58.492,28.983) 58.634,29.124 58.818,28.94 ccw(c58.96,29.081) 59.101,28.94 ccw(c58.96,29.081) 59.101,29.223 58.917,29.407 cw(c59.058,29.548) 58.917,29.69 cw(c59.058,29.548) 59.2,29.69 59.384,29.505 ccw(c59.525,29.647) 59.667,29.505 ccw(c59.525,29.647) 59.667,29.788 59.482,29.973 cw(c59.624,30.114) 59.482,30.256 cw(c59.624,30.114) 59.765,30.256 59.95,30.071 ccw(c60.091,30.213) 60.232,30.071 ccw(c60.091,30.213) 60.232,30.354 60.048,30.538 cw(c60.189,30.68) 60.048,30.821 cw(c60.189,30.68) 60.331,30.821 60.449,30.704 ccw(c60.59,30.845) 60.731,30.704 ccw(c60.59,30.845) 60.731,30.986 60.644,31.074 cw(c60.785,31.215) 60.644,31.357 cw(c60.785,31.215) 60.927,31.357 61.068,31.215 ccw(c61.21,31.357) 61.351,31.215 ccw(c61.21,31.357) 61.351,31.498 cw(c61.492,31.64) 61.351,31.781 62.22,32.651 66.006,36.436 cw(c66.488,35.955) 66.488,36.636 ; 66.489,36.636 76.88,36.636 ccw(c76.88,37.22) 77.293,36.807 78.241,37.755 ccw(c77.8,38.197) 78.424,38.197 78.424,39.92 ; 78.424,39.921 cw(c79.071,39.921) 78.614,40.379 v1(79.28,41.045)
A3: D1.L2.M17 D1.L9.N2 | length 37.9
  Top Layer w0.1: D1.L2.M17@54.22,26.16 v1(54.62,25.76) ; D1.L9.N2@80.48,39.845 v1(80.88,39.445)
  Middle Layer 1 w0.1: v1(54.62,25.76) 54.927,25.453 54.927,25.453 ccw(c55.146,25.672) 55.146,25.362 56.996,25.362 ccw(c56.996,26.242) 57.618,25.619 59.876,27.877 60.194,28.195 cw(c60.335,28.054) 60.477,28.195 60.526,28.145 ccw(c60.668,28.287) 60.809,28.145 ccw(c60.668,28.287) 60.809,28.428 60.558,28.68 cw(c60.699,28.821) 60.558,28.963 cw(c60.699,28.821) 60.84,28.963 61.092,28.711 ccw(c61.234,28.852) 61.375,28.711 ccw(c61.234,28.852) 61.375,28.994 61.123,29.246 cw(c61.265,29.387) 61.123,29.528 cw(c61.265,29.387) 61.406,29.528 61.658,29.277 ccw(c61.799,29.418) 61.941,29.277 ccw(c61.799,29.418) 61.941,29.56 61.689,29.811 cw(c61.83,29.953) 61.689,30.094 cw(c61.83,29.953) 61.972,30.094 62.224,29.842 ccw(c62.365,29.984) 62.506,29.842 ccw(c62.365,29.984) 62.506,30.125 62.457,30.175 cw(c62.598,30.316) 62.457,30.458 63.719,31.721 65.966,33.967 cw(c66.624,33.309) 66.624,34.24 76.371,34.24 ccw(c76.371,34.988) 76.9,34.459 80.325,37.884 ccw(c79.952,38.257) 80.48,38.257 80.48,38.88 cw(c80.878,38.88) 80.597,39.162 v1(80.88,39.445)
A4: D1.L2.M20 D1.L9.P8 | length 37.6
  Top Layer w0.1: D1.L2.M20@56.62,26.16 v1(57.02,25.76) ; v1(75.28,40.245) D1.L9.P8@75.68,40.645
  Middle Layer 2 w0.1: v1(57.02,25.76) 57.387,26.127 ccw(c57.096,26.419) 57.508,26.419 57.508,27.023 cw(c58.783,27.023) 57.881,27.925 67.282,37.325 cw(c67.8,36.807) 67.8,37.54 69.497,37.54 69.547,37.54 ccw(c69.547,37.74) 69.747,37.74 69.747,38.014 cw(c69.947,38.014) 70.147,38.014 70.147,37.123 ccw(c70.347,37.123) 70.547,37.123 70.547,38.014 cw(c70.747,38.014) 70.947,38.014 70.947,37.123 ccw(c71.147,37.123) 71.347,37.123 71.347,38.014 cw(c71.547,38.014) 71.747,38.014 71.747,37.123 ccw(c71.947,37.123) 72.147,37.123 72.147,38.014 cw(c72.347,38.014) 72.547,38.014 72.547,37.123 ccw(c72.747,37.123) 72.947,37.123 72.947,37.965 cw(c73.147,37.965) 73.347,37.965 73.347,37.34 ccw(c73.547,37.34) 73.747,37.34 cw(c73.947,37.34) 73.947,37.54 74.351,37.54 74.485,37.557 ; 74.487,37.557 ccw(c74.351,38.079) 74.535,37.572 ccw(c74.351,38.079) 74.732,37.698 ccw(c74.361,38.068) 74.885,38.068 74.885,39.586 cw(c75.523,39.586) 75.072,40.037 v1(75.28,40.245)
A5: D1.L2.M19 D1.L9.P2 | length 37.9
  Top Layer w0.1: D1.L2.M19@55.82,26.16 v1(56.22,25.76) ; v1(80.08,40.245) D1.L9.P2@80.48,40.645
  Middle Layer 1 w0.1: v1(56.22,25.76) 56.566,26.106 cw(c56.721,25.95) 56.721,26.17 57.251,26.17 ccw(c57.251,26.436) 57.44,26.248 66.001,34.809 cw(c66.586,34.224) 66.586,35.051 67.458,35.051 67.908,35.051 cw(c67.908,34.851) 68.108,34.851 68.108,34.712 ccw(c68.308,34.712) 68.508,34.712 68.508,34.916 cw(c68.708,34.916) 68.908,34.916 68.908,34.712 ccw(c69.108,34.712) 69.308,34.712 69.308,34.916 cw(c69.508,34.916) 69.708,34.916 69.708,34.712 ccw(c69.908,34.712) 70.108,34.712 70.108,34.916 cw(c70.308,34.916) 70.508,34.916 70.508,34.712 ccw(c70.708,34.712) 70.908,34.712 70.908,34.916 cw(c71.108,34.916) 71.308,34.916 71.308,34.712 ccw(c71.508,34.712) 71.708,34.712 71.708,34.916 cw(c71.908,34.916) 72.108,34.916 72.108,34.712 ccw(c72.308,34.712) 72.508,34.712 72.508,34.916 cw(c72.708,34.916) 72.908,34.916 72.908,34.792 ccw(c73.108,34.792) 73.308,34.792 73.308,34.851 cw(c73.508,34.851) 73.508,35.051 74.031,35.051 76.88,35.051 ccw(c76.88,35.514) 77.207,35.187 79.582,37.562 ccw(c79.349,37.795) 79.679,37.795 79.679,39.611 cw(c80.241,39.611) 79.844,40.009 v1(80.08,40.245)
A6: D1.L2.F16 D1.L9.R8 | length 37.9
  Top Layer w0.1: D1.L2.F16@53.42,30.96 v1(53.82,31.36) ; v1(75.273,41.04) D1.L9.R8@75.673,41.44
  Middle Layer 1 w0.1: v1(53.82,31.36) 54.117,31.063 ccw(c54.496,31.442) 54.496,30.906 55.433,30.906 ; 55.434,30.906 ccw(c55.434,31.292) 55.707,31.019 ccw(c55.419,31.308) 55.826,31.308 55.826,34.727 cw(c56.043,34.727) 55.89,34.88 cw(c56.123,34.647) 56.123,34.976 57.02,34.976 ccw(c57.02,35.52) 57.405,35.136 57.755,35.486 57.791,35.522 ccw(c57.649,35.663) 57.791,35.805 57.743,35.852 cw(c57.885,35.994) 57.743,36.135 cw(c57.885,35.994) 58.026,36.135 58.157,36.004 ccw(c58.298,36.146) 58.439,36.004 ccw(c58.298,36.146) 58.439,36.287 58.309,36.418 cw(c58.45,36.559) 58.309,36.701 cw(c58.45,36.559) 58.592,36.701 58.722,36.57 ccw(c58.864,36.712) 59.005,36.57 ccw(c58.864,36.712) 59.005,36.853 58.875,36.983 cw(c59.016,37.125) 58.875,37.266 cw(c59.016,37.125) 59.157,37.266 59.288,37.136 ccw(c59.429,37.277) 59.571,37.136 ccw(c59.429,37.277) 59.571,37.419 59.44,37.549 cw(c59.582,37.691) 59.44,37.832 cw(c59.582,37.691) 59.723,37.832 59.854,37.701 ccw(c59.995,37.843) 60.136,37.701 ccw(c59.995,37.843) 60.136,37.984 60.006,38.115 cw(c60.147,38.256) 60.006,38.398 cw(c60.147,38.256) 60.289,38.398 60.419,38.267 ccw(c60.561,38.409) 60.702,38.267 ccw(c60.561,38.409) 60.702,38.55 60.572,38.681 cw(c60.713,38.822) 60.572,38.963 cw(c60.713,38.822) 60.854,38.963 60.985,38.833 ccw(c61.126,38.974) 61.268,38.833 ccw(c61.126,38.974) 61.268,39.116 61.137,39.246 cw(c61.279,39.388) 61.137,39.529 cw(c61.279,39.388) 61.42,39.529 61.551,39.399 ccw(c61.692,39.54) 61.834,39.399 ccw(c61.692,39.54) 61.834,39.681 61.703,39.812 cw(c61.844,39.953) 61.703,40.095 cw(c61.844,39.953) 61.986,40.095 62.116,39.964 ccw(c62.258,40.106) 62.399,39.964 ccw(c62.258,40.106) 62.399,40.247 62.282,40.365 cw(c62.423,40.506) 62.282,40.647 cw(c62.423,40.506) 62.565,40.647 62.682,40.53 ccw(c62.823,40.671) 62.965,40.53 ccw(c62.823,40.671) 62.965,40.813 62.882,40.896 cw(c63.023,41.037) 62.882,41.179 cw(c63.023,41.037) 63.165,41.179 ccw(c63.306,41.32) 63.448,41.179 63.951,41.683 63.97,41.701 64.527,42.258 cw(c65.063,41.721) 65.063,42.48 71.775,42.48 cw(c71.775,40.312) 73.308,41.845 73.87,41.283 ; 73.87,41.283 ccw(c74.505,41.919) 74.505,41.02 75.225,41.02 ccw(c75.225,41.089) v1(75.273,41.04)
A7: D1.L2.E19 D1.L9.R2 | length 37.9
  Top Layer w0.1: D1.L2.E19@55.82,31.76 v1(56.22,32.16) ; D1.L9.R2@80.48,41.445 v1(80.88,41.045)
  Middle Layer 1 w0.1: v1(56.22,32.16) 56.517,32.457 cw(c56.79,32.184) 56.79,32.57 57.405,32.57 57.455,32.57 57.855,32.57 cw(c57.855,32.37) 58.055,32.37 58.055,31.784 ccw(c58.255,31.784) 58.455,31.784 58.455,32.37 cw(c58.655,32.37) 58.655,32.57 59.158,32.57 59.208,32.57 59.298,32.57 ccw(c59.298,32.996) 59.6,32.695 61.799,34.895 62.117,35.213 cw(c62.259,35.071) 62.4,35.213 62.436,35.177 ccw(c62.578,35.318) 62.719,35.177 ccw(c62.578,35.318) 62.719,35.46 62.192,35.987 cw(c62.333,36.129) 62.192,36.27 cw(c62.333,36.129) 62.475,36.27 63.002,35.742 ccw(c63.143,35.884) 63.285,35.742 ccw(c63.143,35.884) 63.285,36.025 62.757,36.553 cw(c62.899,36.694) 62.757,36.836 cw(c62.899,36.694) 63.04,36.836 63.568,36.308 ccw(c63.709,36.449) 63.851,36.308 ccw(c63.709,36.449) 63.851,36.591 63.423,37.019 cw(c63.564,37.16) 63.423,37.302 cw(c63.564,37.16) 63.705,37.302 63.815,37.193 ccw(c63.956,37.334) 64.097,37.193 64.438,37.533 64.491,37.58 cw(c64.85,37.123) 64.532,37.61 cw(c64.85,37.123) 64.85,37.704 ; 64.851,37.704 76.784,37.704 ccw(c76.784,38.066) 77.04,37.81 77.371,38.141 cw(c77.61,37.902) 77.61,38.24 77.734,38.24 ; 77.735,38.24 ccw(c77.735,38.604) 77.992,38.347 ; 77.993,38.347 ccw(c77.675,38.664) 78.124,38.664 78.124,40.522 cw(c78.395,40.522) 78.203,40.713 78.82,41.33 cw(c79.085,41.065) 79.085,41.44 80.364,41.44 cw(c80.364,41.149) 80.57,41.355 v1(80.88,41.045)
A8: D1.L2.E18 D1.L9.T8 | length 37.9
  Top Layer w0.1: D1.L2.E18@55.02,31.76 v1(55.42,31.36) ; v1(75.28,42.645) D1.L9.T8@75.68,42.245
  Middle Layer 1 w0.1: v1(55.42,31.36) 55.186,31.594 cw(c55.58,31.989) 55.022,31.989 55.022,35.325 cw(c55.643,35.325) 55.204,35.764 62.322,42.882 cw(c62.92,42.284) 62.92,43.13 ; 62.921,43.13 64.286,43.13 64.336,43.13 ccw(c64.336,43.33) 64.536,43.33 64.536,43.448 cw(c64.736,43.448) 64.936,43.448 64.936,43.289 ccw(c65.136,43.289) 65.336,43.289 65.336,43.448 cw(c65.536,43.448) 65.736,43.448 65.736,43.289 ccw(c65.936,43.289) 66.136,43.289 66.136,43.448 cw(c66.336,43.448) 66.536,43.448 66.536,43.289 ccw(c66.736,43.289) 66.936,43.289 66.936,43.448 cw(c67.136,43.448) 67.336,43.448 67.336,43.289 ccw(c67.536,43.289) 67.736,43.289 67.736,43.448 cw(c67.936,43.448) 68.136,43.448 68.136,43.289 ccw(c68.336,43.289) 68.536,43.289 68.536,43.448 cw(c68.736,43.448) 68.936,43.448 68.936,43.289 ccw(c69.136,43.289) 69.336,43.289 69.336,43.448 cw(c69.536,43.448) 69.736,43.448 69.736,43.289 ccw(c69.936,43.289) 70.136,43.289 70.136,43.448 cw(c70.336,43.448) 70.536,43.448 70.536,43.289 ccw(c70.736,43.289) 70.936,43.289 70.936,43.448 cw(c71.136,43.448) 71.336,43.448 71.336,43.289 ccw(c71.536,43.289) 71.736,43.289 71.736,43.448 cw(c71.936,43.448) 72.136,43.448 72.136,43.289 ccw(c72.336,43.289) 72.536,43.289 72.536,43.422 cw(c72.736,43.422) 72.936,43.422 72.936,43.289 ccw(c73.136,43.289) 73.336,43.289 73.336,43.33 cw(c73.536,43.33) 73.736,43.33 ccw(c73.936,43.33) 73.936,43.13 74.545,43.13 74.615,43.13 cw(c74.615,42.696) 74.922,43.003 v1(75.28,42.645)
A9: D1.L2.D20 D1.L9.R3 | length 37.9
  Top Layer w0.1: D1.L2.D20@56.62,32.56 56.621,32.561 57.421,32.561 v1(58.62,33.76) ; v1(79.28,41.845) D1.L9.R3@79.68,41.445
  Middle Layer 1 w0.1: v1(58.62,33.76) 63.335,38.475 cw(c64.167,37.643) 64.167,38.82 64.178,38.82 64.228,38.82 ccw(c64.228,39.02) 64.428,39.02 64.428,39.244 cw(c64.628,39.244) 64.828,39.244 64.828,38.953 ccw(c65.028,38.953) 65.228,38.953 65.228,39.244 cw(c65.428,39.244) 65.628,39.244 65.628,38.955 ccw(c65.828,38.955) 66.028,38.955 66.028,39.244 cw(c66.228,39.244) 66.428,39.244 66.428,38.955 ccw(c66.628,38.955) 66.828,38.955 66.828,39.244 cw(c67.028,39.244) 67.228,39.244 67.228,38.955 ccw(c67.428,38.955) 67.628,38.955 67.628,39.244 cw(c67.828,39.244) 68.028,39.244 68.028,38.955 ccw(c68.228,38.955) 68.428,38.955 68.428,39.244 cw(c68.628,39.244) 68.828,39.244 68.828,38.955 ccw(c69.028,38.955) 69.228,38.955 69.228,39.244 cw(c69.428,39.244) 69.628,39.244 69.628,38.955 ccw(c69.828,38.955) 70.028,38.955 70.028,39.244 cw(c70.228,39.244) 70.428,39.244 70.428,38.955 ccw(c70.628,38.955) 70.828,38.955 70.828,39.244 cw(c71.028,39.244) 71.228,39.244 71.228,38.955 ccw(c71.428,38.955) 71.628,38.955 71.628,39.059 cw(c71.828,39.059) 72.028,39.059 72.028,39.02 ccw(c72.228,39.02) 72.228,38.82 72.643,38.82 73.582,38.82 cw(c73.582,38.453) 73.842,38.713 74.169,38.385 ccw(c74.524,38.74) 74.524,38.238 76.08,38.238 ; 76.116,38.24 ccw(c76.116,38.684) 76.43,38.37 77.675,39.615 ccw(c77.447,39.844) 77.77,39.844 77.77,40.66 cw(c78.255,40.66) 77.912,41.003 78.663,41.754 cw(c78.882,41.537) 78.882,41.845 v1(79.28,41.845)